# Altium PCB PCB1.pcbdoc
Units mil, origin at the board's own origin, x right, y up, seen from the top; angles counter-clockwise.
Board outline 3084.41 x 3895 mil, 2 copper layers (Top Layer, Bottom Layer); 15 components, 12 nets, 34 pads, 0 vias.
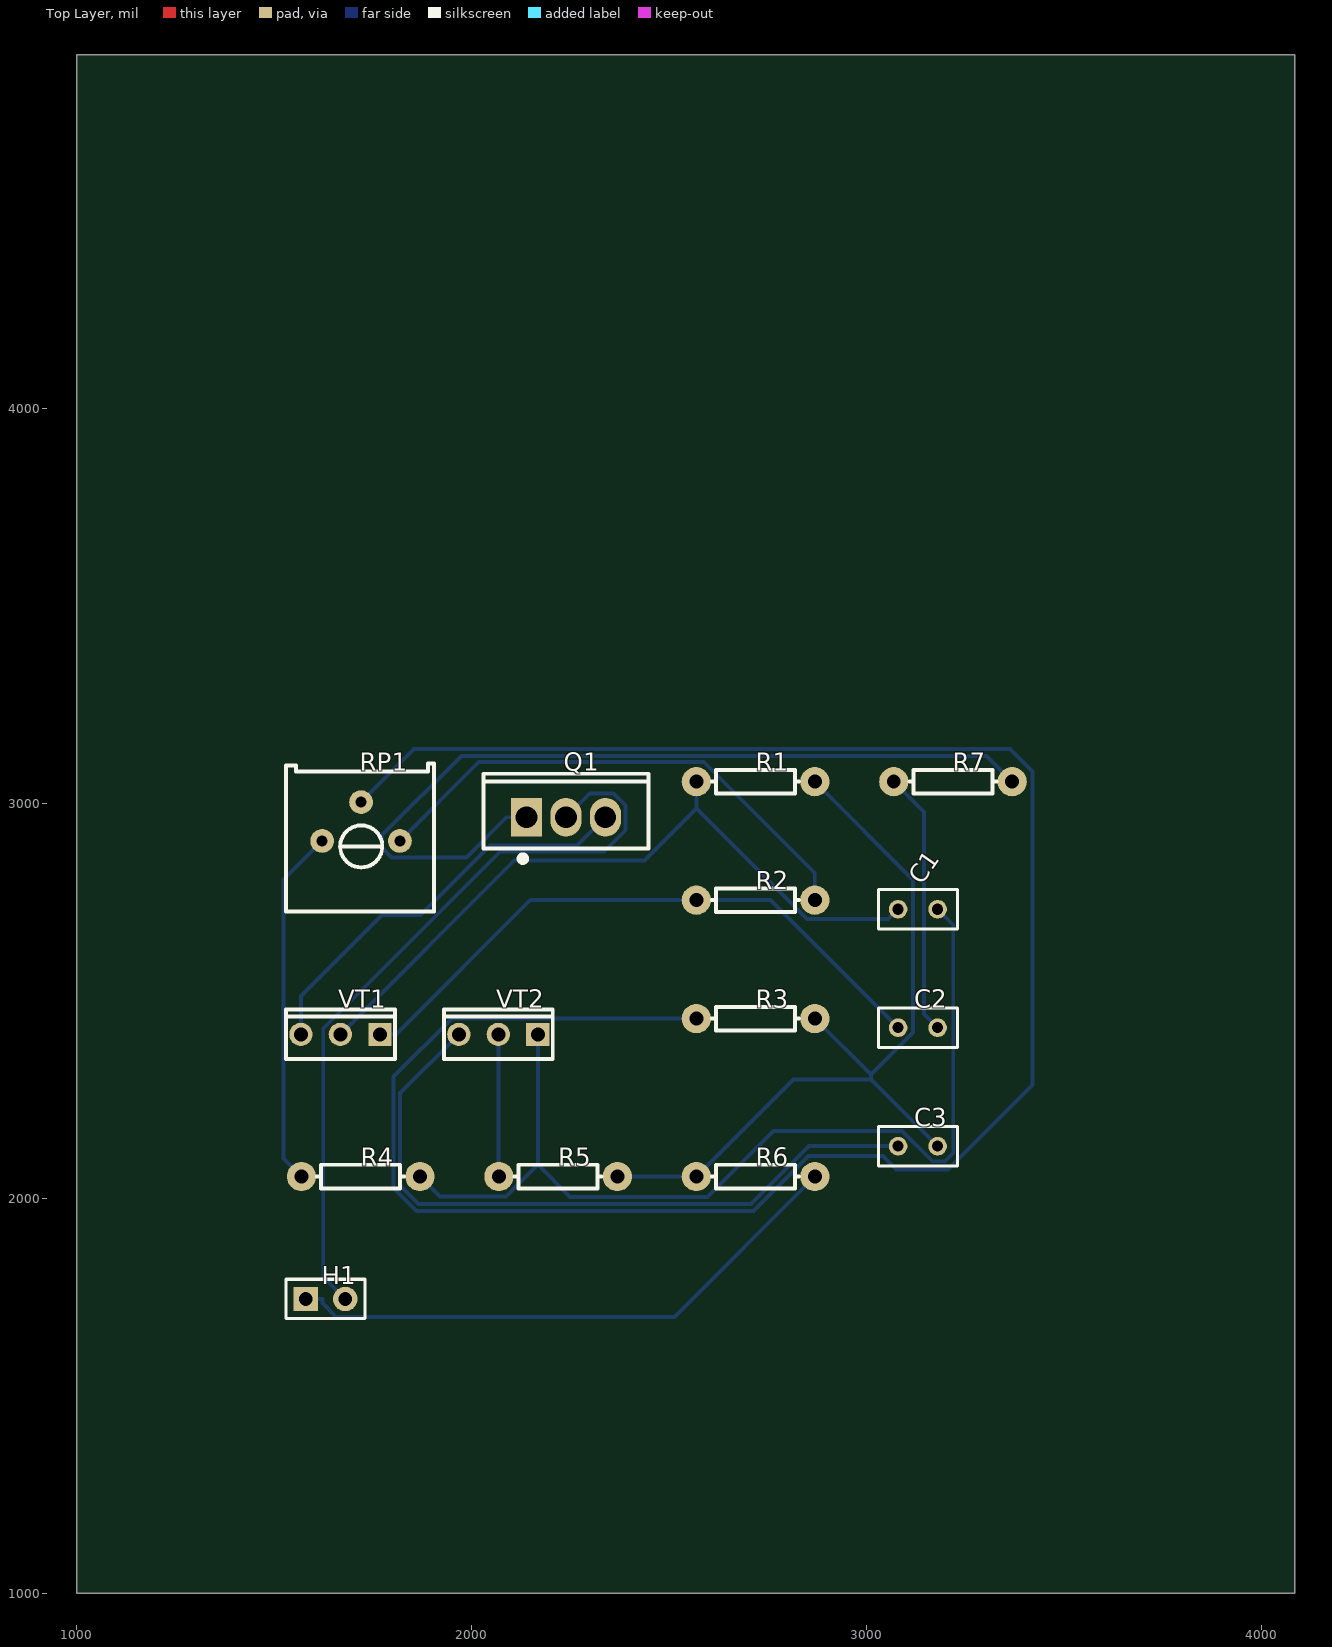
[diagram p0: Top Layer view]
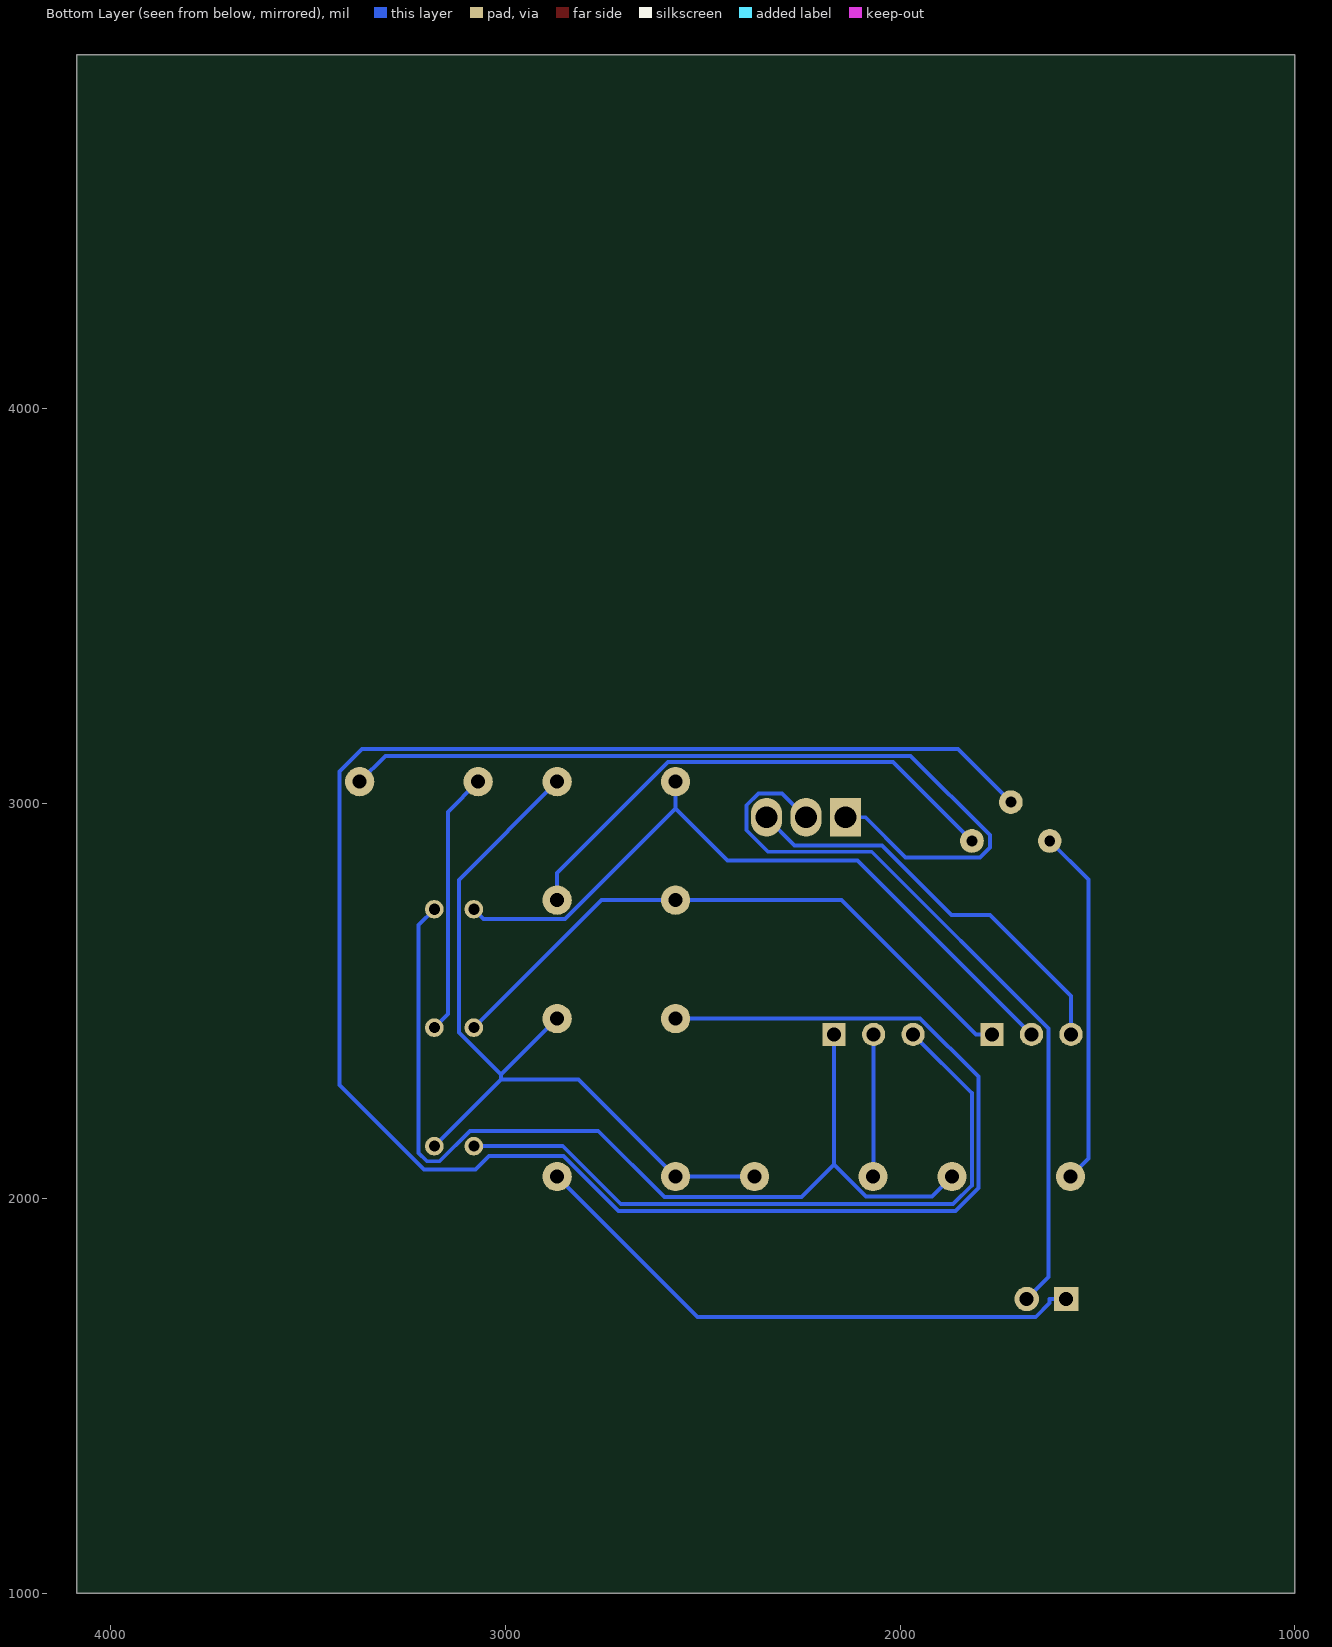
[diagram p1: Bottom Layer view, seen from below]

## Layer stack, top to bottom
Top Solder: solder mask 0.4, Solder Resist, Dk 3.5
Top Layer: signal copper 1.4
Dielectric1: dielectric 12.6, FR-4, Dk 4.8
Bottom Layer: signal copper 1.4
Bottom Solder: solder mask 0.4, Solder Resist, Dk 3.5

## Board outline
4084.41,1000 1000,1000 1000,4895 4084.41,4895

## Design rules (kind name [scope] priority, off if disabled: settings)
Clearance [All] p1: gap=10 ignorepadtopadclearanceinfootprint=FALSE
PolygonConnect [All] p1: connectstyle=Relief reliefconductorwidth=10 reliefentries=4 polygonreliefangle="90 Angle" airgapwidth=10
RoutingVias [All] p1: holewidth=28 width=50 viastyle="Through Hole" minholewidth=28 minwidth=50 maxholewidth=28 maxwidth=50
SolderMaskExpansion [All] p1: expansion=0 istentingtop=FALSE
Width [All] p1: maxlimit=10 minlimit=10 preferedwidth=10
30 further rules are at their usual default settings.

## Components (designator, comment, footprint, x,y, rotation, side; value= is the part's Value field where it differs from the comment)
C1 "4700pF" RAD-0.1 3129.51,2731.6 r0 top
C2 "4700pF" RAD-0.1 3129.51,2431.6 r0 top
C3 "220x16" RAD-0.1 3129.51,2131.6 r0 top
H1 "к нагрузке" HDR-F-2.54_1X2 1629.41,1744.6 r0 top
Q1 "IRFZ44EPBF" PG-TO220-3_L10.0-W4.5-P2.54-L 2238.11,2964.6 r0 top
R1 "4.7k" R_AXIAL-0.3 2718.41,3054.6 r0 top
R2 "2.2k" R_AXIAL-0.3 2718.41,2754.6 r0 top
R3 "27k" R_AXIAL-0.3 2718.41,2454.6 r0 top
R4 "1k" R_AXIAL-0.3 1718.41,2054.6 r0 top
R5 "4.7k" R_AXIAL-0.3 2218.41,2054.6 r0 top
R6 "100" R_AXIAL-0.3 2718.41,2054.6 r0 top
R7 "100" R_AXIAL-0.3 3218.41,3054.6 r0 top
RP1 "150k" RES-ADJ-TH_3386P 1719.41,2953.71 r0 top
VT1 "КТ315Б" KT315_STD 1667.13,2414.6 r0 top
VT2 "КТ315Б" KT315_STD 2067.13,2414.6 r0 top

## Footprints (in the part's own frame and the unit in brackets; to place one, negate y for a bottom-side part, rotate by r counter-clockwise, add the part's x,y. Pads: shape width x height; smd on the part's side, far side on the other; paste and mask are expansions set on the pad)
HDR-F-2.54_1X2 [mil]
  rect 62x62 hole 35 paste-99999 mask+2: 1(-50,0)
  round 62 hole 35 paste-99999 mask+2: 2(50,0)
  silkscreen extent -100,-49 100,50
KT315_STD [mm]
  rect 1.5x1.5 hole 0.9 paste-2539.97 mask+0.051: 1(2.544,0)
  round 1.5 hole 0.9 paste-2539.97 mask+0.051: 2(0,0) 3(-2.54,0)
  silkscreen extent -3.5,-1.59 3.5,1.59
PG-TO220-3_L10.0-W4.5-P2.54-L [mm]
  rect 2x2.5 hole 1.4 paste-2539.97 mask+0.051: 1(-2.54,0)
  oval 2x2.5 hole 1.4 paste-2539.97 mask+0.051: 2(0,0) 3(2.54,0)
  silkscreen extent -5.3,-2.86 5.3,2.8
R_AXIAL-0.3 [mil]
  round 74 hole 35.4 paste-99999 mask+2: 1(-150,0) 2(150,0)
  silkscreen extent -110,-30 110,30
RAD-0.1 [mil]
  round 47 hole 28 paste-99999 mask+2: 1(-50,0) 2(50,0)
  silkscreen extent -100,-50 100,50
RES-ADJ-TH_3386P [mil]
  round 60 hole 27.56 paste-99999 mask+2: 1(98.42,-49.21) 2(0,49.22) 3(-98.43,-49.21)
  silkscreen extent -190,-228 185,147

## Nets (pads, with @x,y where several pads share a name; then routed paths per layer and width w, separated by ;. In a path a pad name is that pad's centre, name@x,y a point inside that pad or via, vN(x,y) a via of type N, cw(c..) or ccw(c..) an arc to the next point about the centre after c; other vN are vias at no path point)
GND: C3.1 Q1.3 VT1.3 VT2.3 | length 2842
  Bottom Layer w10: VT1.3 1567.13,2512.3 1772.42,2717.59 1870.12,2717.59 2045.85,2893.32 2266.83,2893.32 Q1.3 ; VT2.3 1818.39,2265.86 1818.39,2031.66 1865.4,1984.65 2707.29,1984.65 2854.24,2131.6 C3.1
Q1_2: H1.2 Q1.2 | length 1933.3
  Bottom Layer w10: H1.2 1623.65,1800.36 1623.65,2429.22 2071.69,2877.26 2334.79,2877.26 2389.21,2931.68 2389.21,2994.91 2358.99,3025.13 2298.64,3025.13 Q1.2
R1_2: C3.2 R1.2 R3.2 R5.2 R6.1 | length 2084.8
  Bottom Layer w10: R5.2 R6.1 2814.63,2300.82 3010.29,2300.82 ; R3.2 3010.29,2312.72 ; R1.2 3117.02,2805.99 3117.02,2419.45 3010.29,2312.72 ; C3.2 3010.29,2300.82 ; 3010.29,2300.82 3010.29,2312.72
R2_2: R2.2 RP1.1 | length 1318.1
  Bottom Layer w10: RP1.1 2017.47,3104.14 2587.23,3104.14 2868.41,2822.96 R2.2
R3_1: R3.1 RP1.2 | length 5485.1
  Bottom Layer w10: RP1.2 1853.39,3136.9 3362.97,3136.9 3419.67,3080.2 3419.67,2286.71 3205.68,2072.72 3074.89,2072.72 3040.88,2106.73 2852.09,2106.73 2713.21,1967.85 1859.43,1967.85 1801.58,2025.7 1801.58,2307.53 1949.25,2455.2 2567.81,2455.2 R3.1
R4_1: R4.1 RP1.3 | length 909.3
  Bottom Layer w10: R4.1 1523.04,2099.97 1523.04,2806.56 RP1.3
R7_2: Q1.1 R7.2 | length 2156
  Bottom Layer w10: Q1.1 2087.7,2964.6 1986.03,2862.93 1797.06,2862.93 1772.44,2887.55 1772.44,2919.14 1973.5,3120.2 3302.81,3120.2 R7.2
VCC: H1.1 R6.2 | length 1461.2
  Bottom Layer w10: H1.1 1621.42,1744.6 1621.42,1734.1 1656.39,1699.13 2512.94,1699.13 R6.2
VT1_1: C2.1 R2.1 VT1.1 | length 1586.8
  Bottom Layer w10: VT1.1 1807.83,2414.6 2147.83,2754.6 R2.1 2756.51,2754.6 C2.1
VT1_2: C1.1 R1.1 VT1.2 | length 1843.8
  Bottom Layer w10: VT1.2 2107.42,2854.89 2437.01,2854.89 2568.41,2986.29 ; R1.1 2568.41,2986.29 ; C1.1 3054.4,2706.49 2848.21,2706.49 2568.41,2986.29
VT2_1: C1.2 R4.2 VT2.1 | length 2512.1
  Bottom Layer w10: R4.2 1919.11,2003.9 2086.27,2003.9 2167.29,2084.92 ; VT2.1 2167.29,2084.92 ; C1.2 3219.11,2692 3219.11,2114.61 3197.96,2093.46 3166.52,2093.46 3089.58,2170.4 2764.27,2170.4 2596.98,2003.11 2249.1,2003.11 2167.29,2084.92
VT2_2: C2.2 R5.1 R7.1 VT2.2 | length 1029.5
  Bottom Layer w10: VT2.2 2067.13,2055.88 R5.1 ; R7.1 3144.96,2978.05 3144.96,2769.34 3144.96,2466.15 C2.2